# Altium PCB PCB1.PcbDoc (part 1 of 2)
Units mil, origin at the board's own origin, x right, y up, seen from the top; angles counter-clockwise.
Board outline 6255 x 1985 mil, 4 copper layers (Top Layer, Mid Layer 1, Mid Layer 2, Bottom Layer), stack 61.811 mil thick; 94 components, 195 nets, 609 pads, 417 vias.
Unrouted connection lines stored in the file: 4.
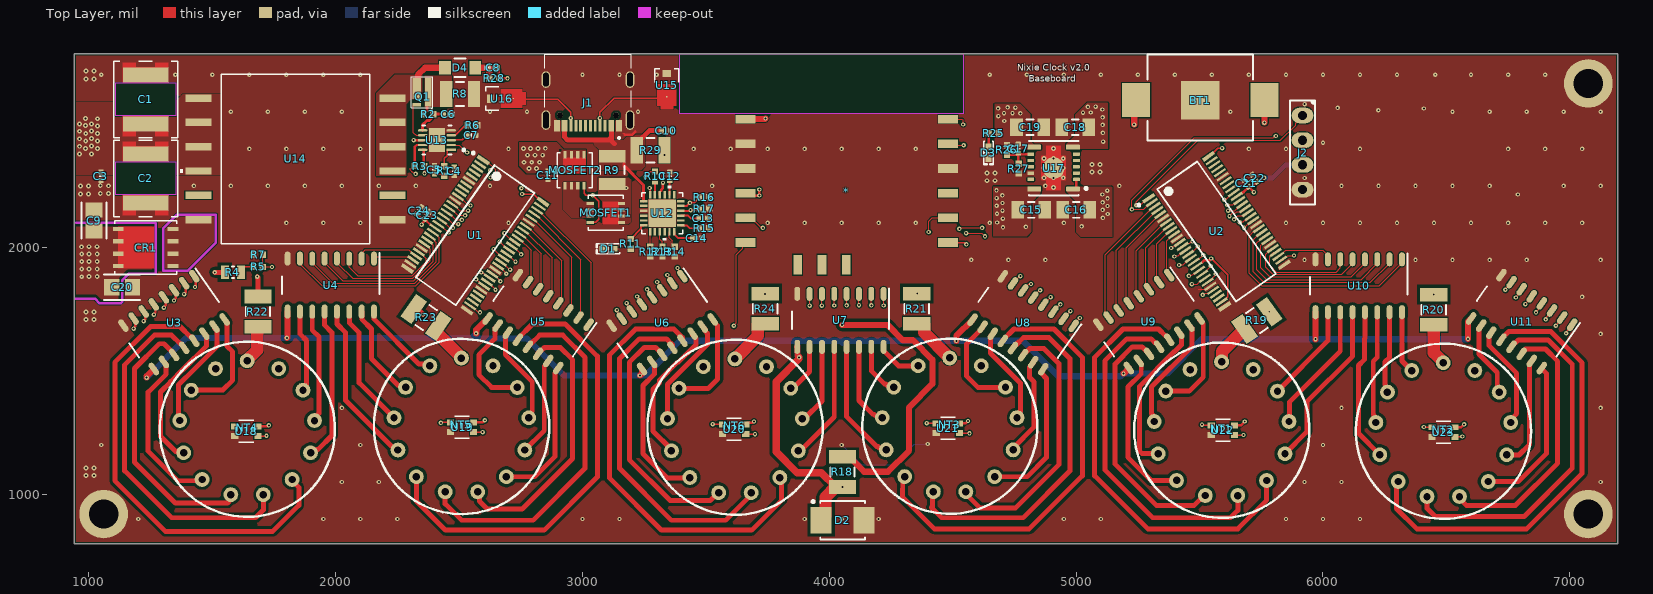
[diagram p0: Top Layer view]
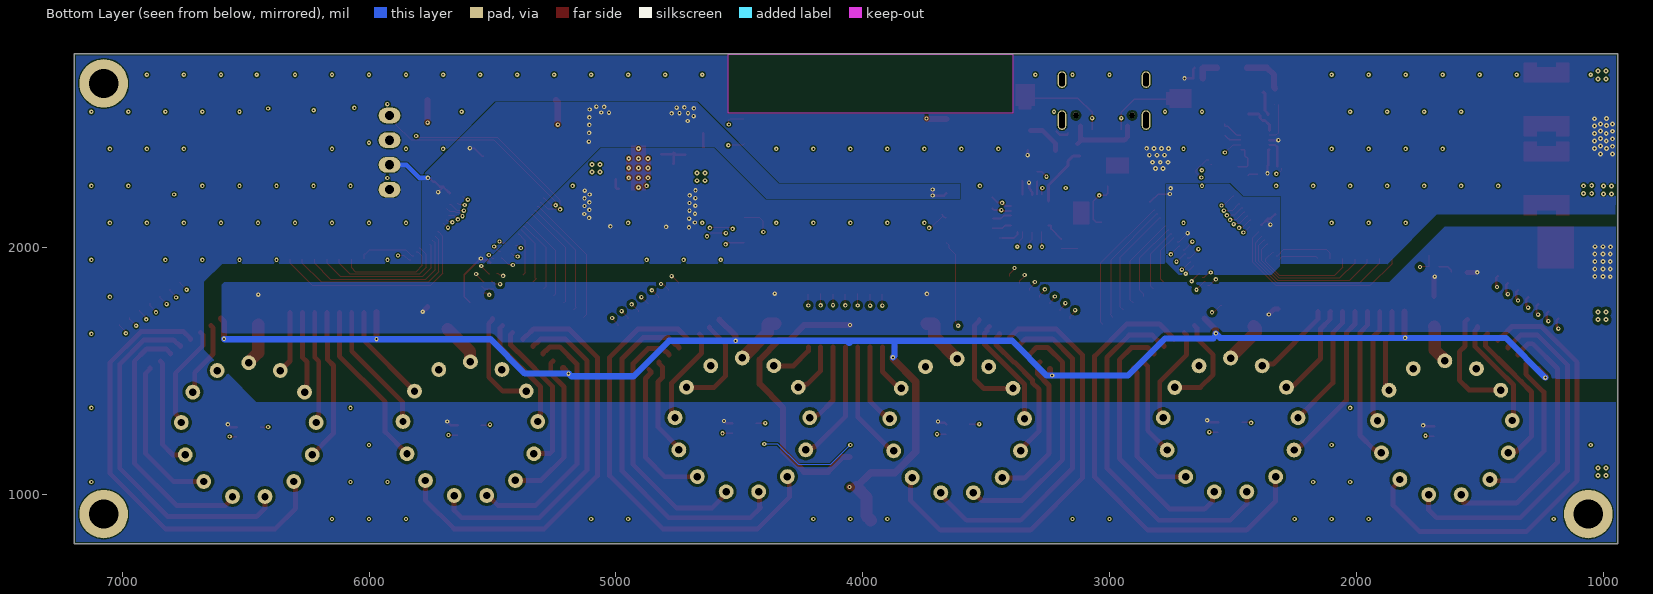
[diagram p1: Bottom Layer view, seen from below]
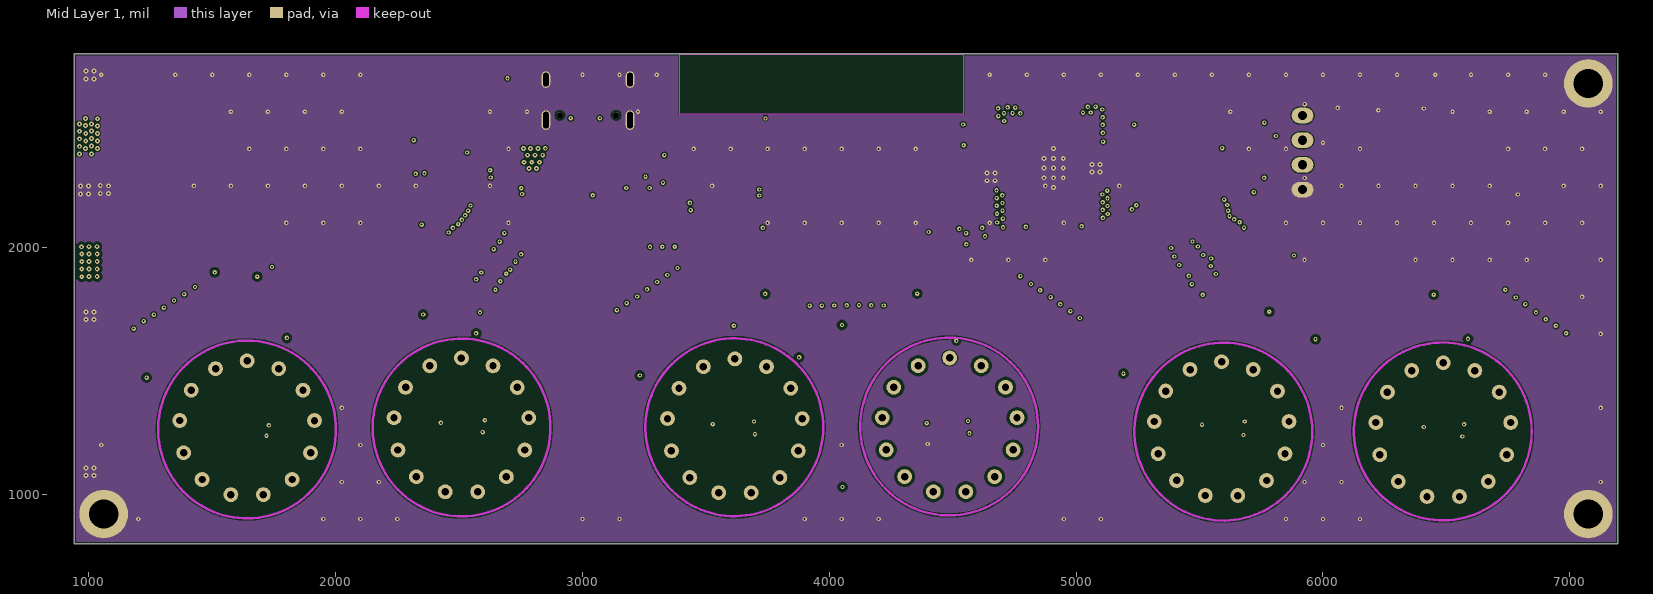
[diagram p2: Mid Layer 1]
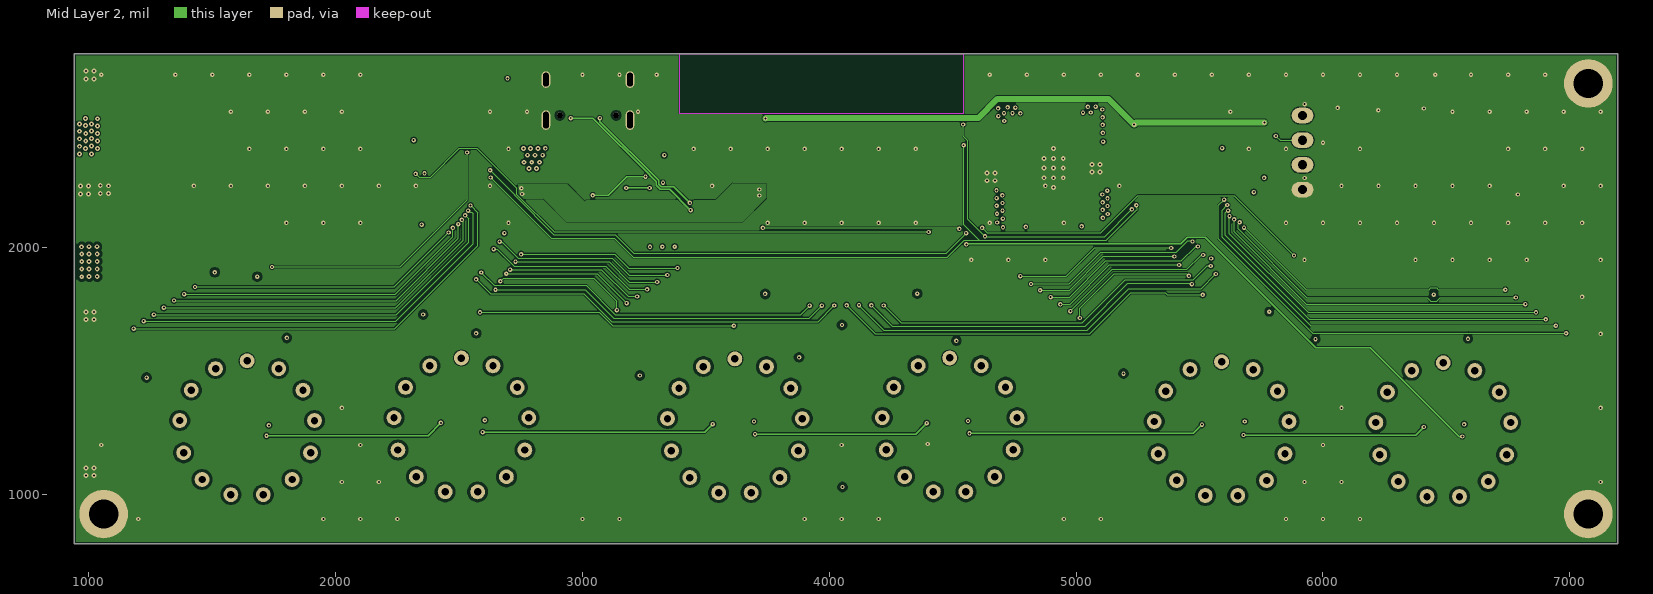
[diagram p3: Mid Layer 2]
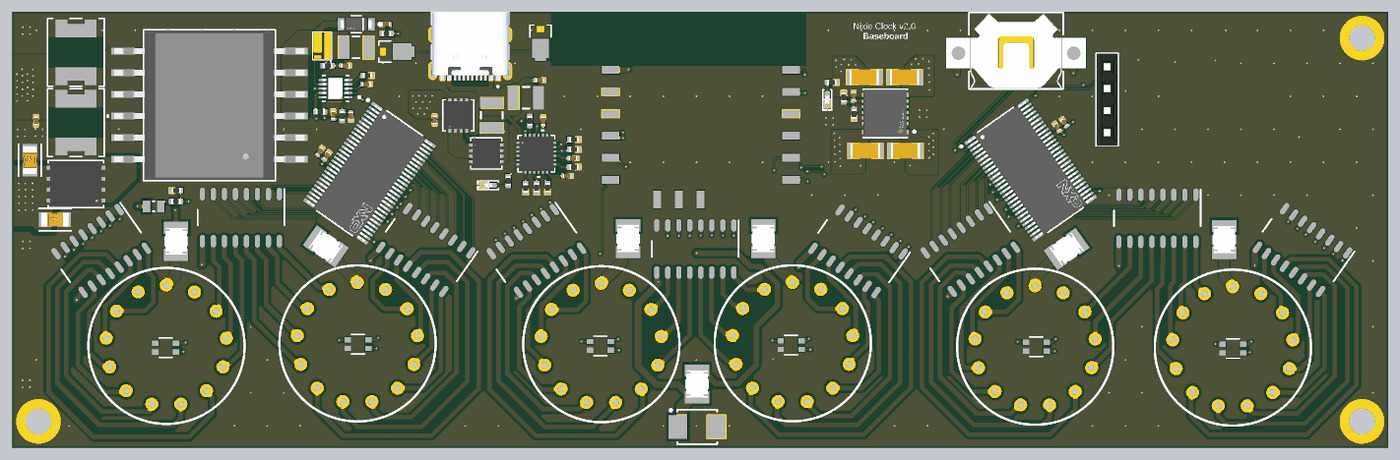
[diagram p5: 3D render of the assembled board from above, using the file's embedded part models]

## Layer stack, top to bottom
Top Solder: solder mask 0.5, Solder Resist, Dk 3.8
Top Layer: signal copper 1.378
Dielectric 1: prepreg 7.874, 7628, Dk 4.6
Mid Layer 1: signal copper 0.689
Core: core 41.9291, FR-4, Dk 4.5
Mid Layer 2: signal copper 0.689
Dielectric 2: prepreg 7.874, 7628, Dk 4.6
Bottom Layer: signal copper 1.378
Bottom Solder: solder mask 0.5, Solder Resist, Dk 3.8

## Board outline
940,800 7195,800 7195,2785 940,2785

## Design rules (kind name [scope] priority, off if disabled: settings)
BoardOutlineClearance [All] p1: gap=7.87 ignorepadtopadclearanceinfootprint=FALSE
Clearance "InNetClass('HV') and InPolygon" [InNetClass('HV')] p1: gap=11.81 ignorepadtopadclearanceinfootprint=FALSE
Clearance "InNetClass('HV') and InPolygon_1" [All vs InNetClass('HV')] p2: gap=11.81 ignorepadtopadclearanceinfootprint=FALSE
Clearance [All] p3: gap=4 ignorepadtopadclearanceinfootprint=FALSE except(5: Arc-Via Track-Via SMDPad-Via THPad-Via Via-Via Via-Fill Via-Poly Via-Region Via-Text; 9.84: Arc-Hole Track-Hole SMDPad-Hole THPad-Hole Via-Hole Fill-Hole Poly-Hole Region-Hole Text-Hole)
ComponentClearance [All] p1: gap=4 collisioncheckmode=3 verticalgap=4 showdistances=TRUE
DiffPairsRouting [All] p1: maxlimit=4 minlimit=4 mostfreqgap=4 toplayer_minwidth=4 toplayer_maxwidth=71497.94 toplayer_prefwidth=4 midlayer1_minwidth=4 midlayer1_maxwidth=71497.94 midlayer1_prefwidth=4 midlayer2_minwidth=4 midlayer2_maxwidth=71497.94 midlayer2_prefwidth=4 bottomlayer_minwidth=4 bottomlayer_maxwidth=71497.94 bottomlayer_prefwidth=4 maxuncoupledlength=500
Height [All] p1: minheight=0 maxheight=71497.94 prefheight=500
HoleSize [All] p1: absolutevalues=TRUE maxlimit=248.03 minlimit=7.87 maxpercent=80.000 minpercent=20.000
HoleToHoleClearance [All] p1: gap=9.84 allowstackedmicrovias=FALSE
MinimumAnnularRing [All] p1: minimumring=3
MinimumSolderMaskSliver [All] p1: minsoldermaskwidth=0
PlaneClearance PlaneClearance_HV [InNetClass('HV') and InPolygon  or  InPolygonClass('GND') and InNetClass('HV')] p1: clearance=19.68
PlaneClearance [All] p2: clearance=4
PlaneConnect PlaneConnectPowerPads [InPadClass('PowerPads')] p1: planeconnectstyle=Direct reliefexpansion=20 reliefentries=4 reliefconductorwidth=10 reliefairgap=10
PlaneConnect [All] p2: planeconnectstyle=Direct reliefexpansion=11.81 reliefentries=4 reliefconductorwidth=4 reliefairgap=4
PolygonConnect PolygonConnectPowerPads [All vs (InPadClass('PowerPads'))] p1: connectstyle=Direct reliefconductorwidth=10 reliefentries=4 polygonreliefangle="90 Angle" airgapwidth=10
PolygonConnect [All] p2: connectstyle=Direct reliefconductorwidth=4 reliefentries=4 polygonreliefangle="90 Angle" airgapwidth=4
RoutingVias [All] p1: holewidth=7.87 width=17.72 viastyle="Through Hole" minholewidth=7.87 minwidth=17.72 maxholewidth=248.03 maxwidth=257.87
SilkToSilkClearance [All] p1: silktosilkclearance=0
SilkToSolderMaskClearance [IsPad] p1: minsilkscreentomaskgap=4 clearancetoexposedcopper=TRUE
SolderMaskExpansion SolderMaskExpansion_Via [IsVia] p1: expansion=2.95 istentingtop=TRUE
SolderMaskExpansion [All] p2: expansion=2.95 istentingtop=FALSE
Width [All] p1: maxlimit=71497.94 minlimit=4 preferedwidth=4
20 further rules are at their usual default settings.

## Classes and differential pairs
net class HV: 170V COM DP_0_0 DP_0_1 DP_0_2 DP_0_3 DP_0_4 DP_0_5 DP_0_6 DP_0_7 DP_0_8 DP_0_9 DP_0_L DP_0_R DP_1_0 DP_1_1 DP_1_2 DP_1_3 DP_1_4 DP_1_5 DP_1_6 DP_1_7 DP_1_8 DP_1_9 DP_1_L DP_1_R DP_2_0 DP_2_1 DP_2_2 DP_2_3 DP_2_4 DP_2_5 DP_2_6 DP_2_7 DP_2_8 DP_2_9 DP_2_L DP_2_R DP_3_0 DP_3_1 DP_3_2 DP_3_3 DP_3_4 DP_3_5 DP_3_6 DP_3_7 DP_3_8 DP_3_9 DP_3_L DP_3_R DP_4_0 DP_4_1 DP_4_2 DP_4_3 DP_4_4 DP_4_5 DP_4_6 DP_4_7 DP_4_8 DP_4_9 DP_4_L DP_4_R DP_5_0 DP_5_1 DP_5_2 DP_5_3 DP_5_4 DP_5_5 DP_5_6 DP_5_7 DP_5_8 DP_5_9 DP_5_L DP_5_R
component class "HV Power": C1 C2 C3 C4 C5 C6 C7 C8 C9 C20 CR1 D4 Q1 R1 R2 R3 R4 R5 R6 R7 R8 R28 U13 U14
component class "ARGB LEDs": U18 U19 U20 U21 U22 U23
component class "Digital Supply": C15 C16 C17 C18 C19 D3 R25 R26 R27 U17
component class "USB PD": C10 C11 C12 C13 C14 D1 J1 MOSFET1 MOSFET2 R9 R10 R11 R12 R13 R14 R15 R16 R17 R29 U12 U15 U16
component class Drivers: C21 C22 C23 C24 D2 NT1 NT2 NT3 NT4 NT5 NT6 R18 R19 R20 R21 R22 R23 R24 U1 U2 U3 U4 U5 U6 U7 U8 U9 U10 U11

## Components (designator, comment, footprint, x,y, rotation, side; value= is the part's Value field where it differs from the comment)
* "" PCBComponent_1#1 3700.59,2787.4 r0 top
BT1 "" FP-3030-MFG 5502.95,2608.27 r180 top
C1 "T52M1107M035C0055" CAP_35C0055_VIS 1230,2600 r270 top
C2 "T52M1107M035C0055" CAP_35C0055_VIS 1230,2280 r90 top
C3 "Capacitor 10µF +/-40% 6.3V 0402" CAPC0402(1005)60_L 1048.94,2288.18 r90 top value=10u
C4 "Capacitor 10µF +/-40% 6.3V 0402" CAPC0402(1005)60_L 2480.32,2309.06 r270 top value=100p
C5 "Capacitor 10µF +/-40% 6.3V 0402" CAPC0402(1005)60_L 2400,2315 r90 top value=22n
C6 "Capacitor 10µF +/-40% 6.3V 0402" CAPC0402(1005)60_L 2455,2540 r180 top value=0.1u
C7 "Capacitor 10µF +/-40% 6.3V 0402" CAPC0402(1005)60_L 2550,2455 r180 top value=0.1u
C8 "Capacitor 10µF +/-40% 6.3V 0402" CAPC0402(1005)60_L 2637.8,2728.35 r0 top value=100p
C9 "C3216X7T2E224K160AA" FP-C3216-160-0_2-IPC_C 1020.67,2109.25 r90 top
C10 "Capacitor 10µF +/-40% 6.3V 0402" CAPC0402(1005)60_L 3338.58,2473.43 r0 top value=0.1u
C11 "Capacitor 10µF +/-40% 6.3V 0402" CAPC0402(1005)60_L 2860,2292.28 r270 top value=0.1u
C12 "Capacitor 10µF +/-40% 6.3V 0402" CAPC0402(1005)60_L 3353.76,2288.03 r90 top value=0.1u
C13 "Capacitor 10µF +/-40% 6.3V 0402" CAPC0402(1005)60_L 3488.76,2118.03 r0 top value=0.1u
C14 "Capacitor 10µF +/-40% 6.3V 0402" CAPC0402(1005)60_L 3463.76,2038.03 r0 top value=0.1u
C15 "Capacitor 10 uF +/- 10% 16 V 1206" CAPC3216X180X50NL20T25 4818.11,2152.12 r180 top value=10u
C16 "Capacitor 10 uF +/- 10% 16 V 1206" CAPC3216X180X50NL20T25 5000.19,2152.12 r0 top value=10u
C17 "Capacitor 22pF +/-10% 50V 0402" CAPC0402(1005)60_L 4764.96,2401.13 r90 top value=22p
C18 "Capacitor 10 uF +/- 10% 16 V 1206" CAPC3216X180X50NL20T25 4996.26,2486.76 r0 top value=47u
C19 "Capacitor 10 uF +/- 10% 16 V 1206" CAPC3216X180X50NL20T25 4813.19,2486.76 r180 top value=47u
C20 "C3216X7T2E224K160AA" FP-C3216-160-0_2-IPC_C 1134.95,1839.09 r0 top
C21 "Capacitor 10µF +/-40% 6.3V 0402" CAPC0402(1005)60_L 5688.98,2259.84 r125 top value=0.1u
C22 "Capacitor 10µF +/-40% 6.3V 0402" CAPC0402(1005)60_L 5722.76,2280.76 r125 top value=0.1u
C23 "Capacitor 10µF +/-40% 6.3V 0402" CAPC0402(1005)60_L 2370.08,2129.92 r55 top value=0.1u
C24 "Capacitor 10µF +/-40% 6.3V 0402" CAPC0402(1005)60_L 2338.58,2149.61 r55 top value=0.1u
CR1 "STTH5R06DJF-TR" POWERFLAT5X6_STM 1230,2000 r180 top
D1 "Red" "LED 0402_1005 YELLOW" 3105,1995 r180 top
D2 "SZ1SMB5948BT3G" ONSC-SMB-2-403A-03_H_V 4053.7,895.05 r0 top
D3 "Yellow" "LED 0402_1005 YELLOW" 4644.69,2384.84 r270 top
D4 "NRVUS1GFA" FP-425AB-MFG 2503.94,2728.35 r180 top
J1 "TYPE-C-31-M-12" HRO_TYPE-C-31-M-12 3022.05,2680.32 r180 top
J2 "" "SAMTEC SSW-104-03-T-S" 5917.32,2384.84 r270 top
MOSFET1 "DMN3008SFGQ-7" PowerDI3333-8_DIO 3095,2140 r0 top
MOSFET2 "DMN3008SFGQ-7" PowerDI3333-8_DIO 2967.8,2313 r90 top
NT1 "Component_1" PCBComponent_1#2 5590,1260 r180 top
NT2 "Component_1" PCBComponent_1#2 6488.19,1255.91 r180 top
NT3 "Component_1" PCBComponent_1#2 4488.19,1275.59 r180 top
NT4 "Component_1" PCBComponent_1#2 1641.73,1263.78 r180 top
NT5 "Component_1" PCBComponent_1#2 2510,1275 r180 top
NT6 "Component_1" PCBComponent_1#2 3618.11,1271.65 r180 top
Q1 "GAN E-Mode NFET" PCBComponent_1#3 2388.93,2585.98 r180 top
R1 "Resistor 10k +/-1% 0402 63 mW" RESC1005X40X25ML05T05 2440,2310 r270 top value=10k
R2 "Resistor 10k +/-1% 0402 63 mW" RESC1005X40X25ML05T05 2375,2540 r0 top value=22R
R3 "Resistor 10k +/-1% 0402 63 mW" RESC1005X40X25ML05T05 2340,2330 r0 top value=12k
R4 "CRCW08050000Z0EA" RESC2013X50X30LL20T20 1583.66,1899.61 r180 top
R5 "Resistor 10k +/-1% 0402 63 mW" RESC1005X40X25ML05T05 1685.28,1921.17 r180 top value=63.4k
R6 "Resistor 10k +/-1% 0402 63 mW" RESC1005X40X25ML05T05 2555,2495 r0 top value=240k
R7 "Resistor 10k +/-1% 0402 63 mW" RESC1005X40X25ML05T05 1685.6,1971.17 r180 top value=10k
R8 "0.02R 1W" RESC3225X70X50NL20T20 2503.94,2622.05 r180 top
R9 "0.02R 1W" RESC3225X70X50NL20T20 3120,2313.9 r90 top
R10 "Resistor 10k +/-1% 0402 63 mW" RESC1005X40X25ML05T05 3293.76,2288.03 r270 top value=100R
R11 "Resistor 10k +/-1% 0402 63 mW" RESC1005X40X25ML05T05 3195,2014.68 r90 top value=1.5k
R12 "Resistor 10k +/-1% 0402 63 mW" RESC1005X40X25ML05T05 3273.76,1983.03 r90 top value=100k
R13 "Resistor 10k +/-1% 0402 63 mW" RESC1005X40X25ML05T05 3323.76,1983.35 r90 top value=100k
R14 "Resistor 10k +/-1% 0402 63 mW" RESC1005X40X25ML05T05 3373.76,1983.35 r90 top value=100k
R15 "Resistor 10k +/-1% 0402 63 mW" RESC1005X40X25ML05T05 3493.45,2078.03 r180 top value=16k
R16 "Resistor 10k +/-1% 0402 63 mW" RESC1005X40X25ML05T05 3493.76,2203.03 r0 top value=5.1k
R17 "Resistor 10k +/-1% 0402 63 mW" RESC1005X40X25ML05T05 3493.76,2158.03 r0 top value=5.1k
R18 "CRCW121033K0JNEA" FP-CRCW1210-e3-IPC_A 4053.15,1090.55 r90 top
R19 "CRCW121033K0JNEA" FP-CRCW1210-e3-IPC_A 5732.28,1704.72 r35 top
R20 "CRCW121033K0JNEA" FP-CRCW1210-e3-IPC_A 6448.82,1748.03 r90 top
R21 "CRCW121033K0JNEA" FP-CRCW1210-e3-IPC_A 4354.33,1751.97 r90 top
R22 "CRCW121033K0JNEA" FP-CRCW1210-e3-IPC_A 1685.04,1740.16 r90 top
R23 "CRCW121033K0JNEA" FP-CRCW1210-e3-IPC_A 2366.14,1716.54 r145 top
R24 "CRCW121033K0JNEA" FP-CRCW1210-e3-IPC_A 3740.16,1751.97 r90 top
R25 "Resistor 10k +/-1% 0402 63 mW" RESC1005X40X25ML05T05 4665.55,2463.14 r0 top value=1.5k
R26 "Resistor 10k +/-1% 0402 63 mW" RESC1005X40X25ML05T05 4719.68,2395.23 r90 top value=10k
R27 "Resistor 10k +/-1% 0402 63 mW" RESC1005X40X25ML05T05 4766.93,2319.44 r270 top value=4.32k
R28 "Resistor 10k +/-1% 0402 63 mW" RESC1005X40X25ML05T05 2641.73,2685.04 r0 top value=10k
R29 "IsDirectPower DNC" RESC3225X70X50NL20T20 3275.59,2393.7 r180 top
U1 "PCA9698DGG,512" FP-SOT364-1-MFG 2565,2050 r325 top
U2 "PCA9698DGG,512" FP-SOT364-1-MFG 5568.9,2064.96 r35 top
U3 "SN75469DR" D0016A_N 1344.9,1695.9 r305 top
U4 "SN75469DR" D0016A_N 1980,1847.72 r270 top
U5 "SN75469DR" D0016A_N 2820,1700 r235 top
U6 "SN75469DR" D0016A_N 3322.83,1695.87 r305 top
U7 "SN75469DR" D0016A_N 4045,1705 r270 top
U8 "SN75469DR" D0016A_N 4785,1695 r235 top
U9 "SN75469DR" D0016A_N 5295,1700 r305 top
U10 "SN75469DR" D0016A_N 6145,1845 r270 top
U11 "SN75469DR" D0016A_N 6805,1700 r235 top
U12 "AP33771DKZ-13" QFN24_W-QFN4040-24_A1_DIO 3322.85,2138.98 r0 top
U13 "LT3757EDD#PBF" FP-DD-10-05-08-1699-IPC_A 2410,2435 r180 top
U14 "DA2032-ALD" SOIC12_LT3750_DA2032_14P98X17P2_COC 1837,2359.21 r180 top
U15 "T6N12CAHM3I" DFN3820A-2_VIS 3341.54,2638.98 r90 top
U16 "T6N12CAHM3I" DFN3820A-2_VIS 2691.93,2603.35 r180 top
U17 "TPSM53604RDAR" FP-RDA0015A-MFG 4908.46,2321.85 r180 top
U18 "WS2812B-2020" SMT_12B-2020_WDS 1637.8,1255.91 r0 top
U19 "WS2812B-2020" SMT_12B-2020_WDS 2511.81,1271.65 r0 top
U20 "WS2812B-2020" SMT_12B-2020_WDS 3614.17,1263.78 r0 top
U21 "WS2812B-2020" SMT_12B-2020_WDS 4480.31,1267.72 r0 top
U22 "WS2812B-2020" SMT_12B-2020_WDS 5594.49,1259.84 r0 top
U23 "WS2812B-2020" SMT_12B-2020_WDS 6488.19,1251.97 r0 top

## Footprints (in the part's own frame and the unit in brackets; to place one, negate y for a bottom-side part, rotate by r counter-clockwise, add the part's x,y. Pads: shape width x height; smd on the part's side, far side on the other; paste and mask are expansions set on the pad)
CAP_35C0055_VIS [mil]
  rect 60.5x185 smd paste+0 mask+0: 1(-99.25,0) 2(99.25,0)
  Top Layer region: 149.5,-92.5 69,-92.5 69,92.5 149.5,92.5 149.5,39.35 129.5,39.35 129.5,-39.35 149.5,-39.35
  Top Layer region: -69,92.5 -69,-92.5 -149.5,-92.5 -149.5,-39.35 -129.5,-39.35 -129.5,39.35 -149.5,39.35 -149.5,92.5
  Top Layer keep-out region: -67,-122 -67,122 67,122 67,-122
  silkscreen extent -155,-129 155,129
CAPC0402(1005)60_L [mm] "Chip Capacitor, Body 1.0x0.5mm, Height 0.6mm, IPC High Density"
  rrect25% 0.5x0.55 smd: 1(-0.45,0) 2(0.45,0)
  silkscreen extent 0,-0.2 0,0.2, body extent -0.5,-0.25 0.5,0.25, height 0.6
CAPC3216X180X50NL20T25 [mm] "Chip Capacitor, 2-Leads, Body 3.40x1.80mm, IPC Medium Density"
  rect 1.3x1.8 smd: 1(-1.4,0) 2(1.4,0)
  silkscreen extent -0.35,-0.8 0.35,0.8, body extent -1.7,-0.9 1.7,0.9, height 1.8
D0016A_N [mm]
  oval 1.45x0.6 smd paste+0 mask+0: 1(-2.725,4.445) 2(-2.725,3.175) 3(-2.725,1.905) 4(-2.725,0.635) 5(-2.725,-0.635) 6(-2.725,-1.905) 7(-2.725,-3.175) 8(-2.725,-4.445) 9(2.725,-4.445) 10(2.725,-3.175) 11(2.725,-1.905) 12(2.725,-0.635) 13(2.725,0.635) 14(2.725,1.905) 15(2.725,3.175) 16(2.725,4.445)
  silkscreen extent -3.3,-5 0.9,5
DFN3820A-2_VIS [mil]
  rect 5x5 smd paste-2.5 mask-2.5: 1(-27.76,0)
  rect 28x34 smd paste-14 mask+0: 2(65.98,0)
  Top Layer region: 2,-36.02 2,-36.02 2,-36.02 2,-36.02 2,-36.02 2,-36.02 2,-36.02 2,-36.02
  Top Layer region: 2,36.02 2,36.02 2,36.02 2,36.02 2,36.02 2,36.02 2,36.02 2,36.02
  Top Layer region: -77.96,25.59 -77.96,-25.59 -64.18,-25.59 -64.18,-37.99 22.43,-37.99 22.43,37.99 -64.18,37.99 -64.18,25.59
  silkscreen extent 31,-48 85,48
FP-425AB-MFG [mm]
  rect 1.2x1.4 smd paste+0 mask+0: 1(-1.55,0) 2(1.55,0)
  silkscreen extent -2.83,-0.95 0.58,0.95, body extent -2.25,-1.05 2.25,1.05, height 0.25
FP-3030-MFG [mm]
  rect 3.96x3.96 smd paste-1000 mask+0: 1(0,0.292)
  rect 2.9x3.5 smd paste+0 mask+0: 2(-6.6,0.292) 2(6.6,0.292)
  silkscreen extent -5.44,-4.43 5.44,4.43, body extent -8.15,-4.53 8.15,4.53, height 0.25
FP-C3216-160-0_2-IPC_C [mil]
  rect 61.18x67.17 smd paste+0 mask+0: 1(-42.37,0) 2(42.37,0)
  silkscreen extent -73,-51 73,51, body extent -77,-39 77,39, height 10
FP-CRCW1210-e3-IPC_A [mil]
  rect 55.31x110.48 smd paste+0 mask+0: 1(-61.05,0) 2(61.05,0)
  silkscreen extent -19,-49 19,49, body extent -108,-75 108,75, height 10
FP-DD-10-05-08-1699-IPC_A [mm]
  rect 0.981x0.242 smd paste+0 mask+0: 1(-1.466,1)
  rrect100% 0.981x0.242 smd paste+0 mask+0: 2(-1.466,0.5) 3(-1.466,0) 4(-1.466,-0.5) 5(-1.466,-1) 6(1.466,-1) 7(1.466,-0.5) 8(1.466,0) 9(1.466,0.5) 10(1.466,1)
  rect 1.65x2.48 smd paste-1000 mask+0: 11(0,0)
  silkscreen extent -2.88,-1.5 1.5,1.5, body extent -2.46,-2 2.46,2, height 0.25
FP-RDA0015A-MFG [mm]
  rrect20% 1.4x0.5 smd paste-1000 mask+0: 1(-2,2.145) 7(-2,-2.155) 8(2,-2.155) 14(2,2.145)
  rrect29% 0.7x0.35 smd paste-1000 mask+0: 2(-2.35,1.17) 3(-2.35,0.52) 4(-2.35,-0.13) 5(-2.35,-0.78) 6(-2.35,-1.43) 9(2.35,-1.43) 10(2.35,-0.78) 11(2.35,-0.13) 12(2.35,0.52) 13(2.35,1.17)
  round 2.25 smd paste-1000 mask+0: 15(0,0)
  Top Layer region: -0.75,2.3 -0.757,2.275 -0.75,2.25 -0.75,2.25 -0.75,1.3 -0.754,1.281 -0.765,1.265 -0.781,1.254 -0.8,1.25 -0.8,1.25 -1.2,1.25 -1.225,1.243 -1.243,1.225 -1.25,1.2 -1.25,1.2 -1.25,-1.2 -1.243,-1.225 -1.225,-1.243 -1.2,-1.25 -1.2,-1.25 -0.8,-1.25 -0.781,-1.254 -0.765,-1.265 -0.754,-1.281 -0.75,-1.3 -0.75,-1.3 -0.75,-2.25 -0.743,-2.275 -0.725,-2.293 -0.7,-2.3 -0.7,-2.3 0.7,-2.3 0.725,-2.293 0.743,-2.275 0.75,-2.25 0.75,-2.25 0.75,-1.3 0.754,-1.281 0.765,-1.265 0.781,-1.254 0.8,-1.25 0.8,-1.25 1.2,-1.25 1.225,-1.243 1.243,-1.225 1.25,-1.2 1.25,-1.2 1.25,1.2 1.243,1.225 1.225,1.243 1.2,1.25 1.2,1.25 0.8,1.25 0.781,1.254 0.765,1.265 0.754,1.281 0.75,1.3 0.75,1.3 0.75,2.25 0.743,2.275 0.725,2.293 0.7,2.3 0.7,2.3
  silkscreen extent -3.48,-2.8 2.55,2.8, body extent -2.8,-2.9 2.8,2.9, height 0.25
FP-SOT364-1-MFG [mm]
  rect 1.4x0.4 smd paste+0 mask+0: 1(-3.75,6.81) 28(-3.75,-6.81) 29(3.75,-6.81) 56(3.75,6.81)
  rect 1.4x0.28 smd paste+0 mask+0: 2(-3.75,6.25) 3(-3.75,5.75) 4(-3.75,5.25) 5(-3.75,4.75) 6(-3.75,4.25) 7(-3.75,3.75) 8(-3.75,3.25) 9(-3.75,2.75) 10(-3.75,2.25) 11(-3.75,1.75) 12(-3.75,1.25) 13(-3.75,0.75) 14(-3.75,0.25) 15(-3.75,-0.25) 16(-3.75,-0.75) 17(-3.75,-1.25) 18(-3.75,-1.75) 19(-3.75,-2.25) 20(-3.75,-2.75) 21(-3.75,-3.25) 22(-3.75,-3.75) 23(-3.75,-4.25) 24(-3.75,-4.75) 25(-3.75,-5.25) 26(-3.75,-5.75) 27(-3.75,-6.25) 30(3.75,-6.25) 31(3.75,-5.75) 32(3.75,-5.25) 33(3.75,-4.75) 34(3.75,-4.25) 35(3.75,-3.75) 36(3.75,-3.25) 37(3.75,-2.75) 38(3.75,-2.25) 39(3.75,-1.75) 40(3.75,-1.25) 41(3.75,-0.75) 42(3.75,-0.25) 43(3.75,0.25) 44(3.75,0.75) 45(3.75,1.25) 46(3.75,1.75) 47(3.75,2.25) 48(3.75,2.75) 49(3.75,3.25) 50(3.75,3.75) 51(3.75,4.25) 52(3.75,4.75) 53(3.75,5.25) 54(3.75,5.75) 55(3.75,6.25)
  silkscreen extent -5.12,-7.05 2.5,7.05, body extent -4.55,-7.3 4.55,7.3, height 0.25
HRO_TYPE-C-31-M-12 [mm]
  rect 0.6x1.14 smd mask+0.05: A1_B12(-3.2,4.75) A4_B9(-2.4,4.75) B1_A12(3.2,4.75) B4_A9(2.4,4.75)
  rect 0.3x1.14 smd mask+0.05: A5(-1.25,4.75) A6(-0.25,4.75) A7(0.25,4.75) A8(1.25,4.75) B5(1.75,4.75) B6(0.75,4.75) B7(-0.75,4.75) B8(-1.75,4.75)
  oval 0.9x2 hole 0.6 slot 1.7 at 90 deg: S1(-4.325,4.17) S2(4.325,4.17)
  oval 0.9x1.7 hole 0.6 slot 1.4 at 90 deg: S3(-4.325,0) S4(4.325,0)
  round 0.6 hole 0.6 unplated: ""(-2.89,3.68) ""(2.89,3.68)
  silkscreen extent -4.47,-2.6 4.47,6.1, body extent -4.47,-2.6 4.47,5.31, height 3.31
"LED 0402_1005 YELLOW" [mm] "Chip Diode, 2-Leads, Body 1.00x0.50mm, IPC Medium Density"
  rect 0.75x0.6 smd: 1(-0.575,0) 2(0.575,0)
  silkscreen extent -1.14,-0.51 1.27,0.51, body extent -0.5,-0.25 0.5,0.25, height 0.21
ONSC-SMB-2-403A-03_H_V [mil] "Molded, 2-Leads, Body 4.6x3.95mm"
  rect 85x107.99 smd: 1(-87.01,0) 2(87.01,0)
  silkscreen extent -125,-79 91,81, body extent -91,-78 91,78, height 95
PCBComponent_1#1 [mil]
  rect 80x35 smd: 1(-40.28,-267.13) 2(-40.28,-367.13) 3(-40.28,-467.13) 4(-40.28,-567.13) 5(-40.28,-667.13) 6(-40.28,-767.13) 10(779.72,-767.13) 11(779.72,-667.13) 12(779.72,-567.13) 13(779.72,-467.13) 14(779.72,-367.13) 15(779.72,-267.13)
  rect 35x80 smd: 7(171.02,-857.13) 8(269.45,-857.13) 9(367.87,-857.13)
  Top Layer lines w6: -40.28,-667.13 -34.78,-667.13 -27.53,-659.88 -20.28,-652.63
PCBComponent_1#2 [mil]
  round 60 hole 30: 1(0.74,-277.03) 2(-127.18,-245.47) 3(-225.65,-158.15) 4(-272.27,-35.07) 5(-256.36,95.58) 6(-181.56,203.87) 7(-65,265) 8(66.61,264.97) 9(183.14,203.78) 10(257.88,95.45) 11(273.73,-35.21) 12(227.04,-158.26) 13(128.53,-245.53)
  silkscreen extent -355,-355 355,355
PCBComponent_1#3 [mil]
  rect 33.46x13.78 / inner rect 0x0 / far side rect 0x0 all layers, no hole: 1(60.16,7)
  rect 25.2x115.75 / inner rect 0x0 / far side rect 0x115.75 all layers, no hole: 2(13.93,-44.02)
  rect 33.46x86.22 / inner rect 0x0 / far side rect 0x0 all layers, no hole: 3(60.11,-58.67)
  silkscreen extent -4,-106 83,30
PowerDI3333-8_DIO [mil]
  rect 30x13 smd paste+0 mask+0: 1(-63,38.39) 2(-63,12.8) 3(-63,-12.8) 4(-63,-38.39) 5(63,-38.39) 6(63,-12.8) 7(63,12.8) 8(63,38.39)
  Top Layer region: 51,-45.5 51,45.5 -13,45.5 -13,-45.5
  silkscreen extent -71,-71 71,71, body extent -66,-66 66,66, height 32
POWERFLAT5X6_STM [mil]
  rect 44x18 smd paste+0 mask+0: 1(-111,75) 2(-111,25) 3(-111,-25) 4(-111,-75) 5(111,-75) 6(111,-25) 7(111,25) 8(111,75)
  Top Layer region: 112,-85 112,85 -34,85 -34,-85
  silkscreen extent -126,-108 126,108, body extent -121,-103 121,103, height 39
QFN24_W-QFN4040-24_A1_DIO [mil]
  rect 30x10 smd paste+0 mask+0: 1(-75.5,49.21) 2(-75.5,29.53) 3(-75.5,9.84) 4(-75.5,-9.84) 5(-75.5,-29.53) 6(-75.5,-49.21) 13(75.5,-49.21) 14(75.5,-29.53) 15(75.5,-9.84) 16(75.5,9.84) 17(75.5,29.53) 18(75.5,49.21)
  rect 10x30 smd paste+0 mask+0: 7(-49.21,-75.5) 8(-29.53,-75.5) 9(-9.84,-75.5) 10(9.84,-75.5) 11(29.53,-75.5) 12(49.21,-75.5) 19(49.21,75.5) 20(29.53,75.5) 21(9.84,75.5) 22(-9.84,75.5) 23(-29.53,75.5) 24(-49.21,75.5)
  rect 112x112 smd paste+0 mask+0: 25(0,0)
  silkscreen extent -84,-110 84,110, body extent -79,-79 79,79, height 55
RESC1005X40X25ML05T05 [mm] "Chip Resistor, 2-Leads, Body 1.05x0.55mm, IPC Low Density"
  rect 0.65x0.65 smd: 1(-0.5,0) 2(0.5,0)
  body extent -0.53,-0.28 0.53,0.28, height 0.4
RESC2013X50X30LL20T20 [mm] "Chip Resistor, 2-Leads, Body 2.00x1.25mm, IPC High Density"
  rect 0.85x1.35 smd: 1(-0.825,0) 2(0.825,0)
  silkscreen extent -0.1,-0.58 0.1,0.58, body extent -1.1,-0.72 1.1,0.72, height 0.5
RESC3225X70X50NL20T20 [mm] "Chip Resistor, 2-Leads, Body 3.20x2.50mm, IPC Medium Density"
  rect 1.25x2.7 smd: 1(-1.425,0) 2(1.425,0)
  silkscreen extent -0.4,-1.25 0.4,1.25, body extent -1.7,-1.35 1.7,1.35, height 0.7
"SAMTEC SSW-104-03-T-S" [mm]
  oval 1.6x2.25 hole 0.95: 1(-3.81,0) 2(-1.27,0) 3(1.27,0) 4(3.81,0)
  silkscreen extent -5.34,-1.27 5.34,1.27, body extent -5.33,-1.21 5.33,1.21, height 8.51
SMT_12B-2020_WDS [mil]
  rect 29x24 smd paste+0 mask+0: 1(-47,19.68) 2(-47,-19.69) 3(47,-19.69) 4(47,19.68)
  silkscreen extent -30,-44 30,44
SOIC12_LT3750_DA2032_14P98X17P2_COC [mil]
  rect 107x30 smd paste+0 mask+0: 1(-393,246.06) 2(-393,147.64) 3(-393,49.21) 4(-393,-49.21) 5(-393,-147.64) 6(-393,-246.06) 7(393,-246.06) 8(393,-147.64) 9(393,-49.21) 10(393,49.21) 11(393,147.64) 12(393,246.06)
  silkscreen extent -300,-344 466,343, body extent -433,-339 433,339, height 350

## Part data
* Q1: library part Component_1
BT1: library part CMP-19636-000028-1, "BATT RETAINER COIN 10MM 1CEL SMD", Case/Package=SMD/SMT, Package Quantity=100, Contact Plating=Tin, Lead Free="Lead Free", Material=Bronze, Mount="Surface Mount", Number of Cells=1, RoHS Compliant=Yes, series=-, Termination=SMD/SMT
C1 C2 U15 U16: "No Description Available", Mfr_Name=Vishay
  U15 U16: RefDes=RefDes, Type=Type
C3 C4 C5 C6 C7 C8 C10 C11 C12 C13 C14 C21 C22 C23 C24: library part CMP-001-00074-3, "Chip Capacitor, 0.1µF +/-40%, 6.3V, 0402, Thickness 0.6 mm", Case/Package=0402, Max Operating Temperature=85°C, Min Operating Temperature=-55°C, Tolerance=10%, Voltage Rating=6.3V, Mounting Technology=SMT, Pins=2
C9 C20: library part CMP-08246-005598-1, "Multilayer Ceramic Capacitors 220nF ±10% 250V X7T SMD 1206", Capacitance=220nF, Case Code (Imperial)=1206, Case Code (Metric)=3216, Dielectric=X7T, Max Operating Temperature=125°C, Min Operating Temperature=-55°C, Package Quantity=1, Tolerance=10%, Voltage Rating=250V, Case/Package=1206, Depth=1.6mm, Lead Free="Lead Free", Length=0.126inch, Mount="Surface Mount", packaging="Tape and Reel", REACH SVHC="No SVHC", RoHS Compliant=Yes, series=C, Thickness=0.075inch, Voltage Rating (DC)=250V, Width=0.063inch
C15 C16 C18 C19: library part CMP-001-00016-6, "Chip Capacitor, 47 uF, +/- 10%, 16 V, 1206 (3216 Metric)", Capacitor Type=Ceramic, Case/Package=1206, Max Operating Temperature=125°C, Min Operating Temperature=-55°C, Tolerance=10%, Voltage Rating=16V, Mounting Technology=SM, Pins=2, RoHS Compliant=True
C17: library part CMP-001-00073-3, "Chip Capacitor, 22pF +/-10%, 50V, 0402, Thickness 0.6 mm", Case/Package=0402, Max Operating Temperature=85°C, Min Operating Temperature=-55°C, Tolerance=10%, Voltage Rating=50V, Mounting Technology=SMT, Pins=2
CR1: "No Description Available", Mfr_Name=STMicroelectronics, RefDes=RefDes, Type=Type
D1: library part BL-HKC37A-AV-TRB, "0402 RED", Color=Yellow, Current - Test=20mA, Device Package="0402 (1005 Metric)", Lens Color=Colorless, Manufacturer="American Bright Optoelectronics Corporation", Millicandela Rating=120mcd, Supplier Device Package=0402, Supplier Part Number 1=BL-HKC37A-AV-TRBCT-ND, Voltage - Forward (Vf) (Typ)=2.2V, componentlink1description=Datasheet, componentlink1url=https://americanbrightled.com/pdffiles/smt/BL-HKC37A-AV-TRB.pdf, ComponentLink2Description="DigiKey Link", ComponentLink2URL=https://www.digikey.com/en/products/detail/american-bright-optoelectronics-corporation/BL-HKC37A-AV-TRB/9678171, Configuration=Standard, Height (Max)=0.45mm, lastupdated="11/9/2022 10:29:51 am", Lens Style="Rectangle with Flat Top", Lens Transparency=Clear, Lifecycle Status=Active, Minimum Order=1, Mounting Type="Surface Mount", Package / Case="0402 (1005 Metric)", packaging=TapeAndReel, Part Number=BL-HKC37A-AV-TRB, Part Status=Active, partid=1041, price=0.06, series=-, Size / Dimension="1.00mm L x 0.50mm W", Supplier 1=DigiKey, Viewing Angle=120°, Wavelength - Dominant=589nm, Wavelength - Peak=590nm
D2: library part CMP-1060-00202-1, "3 W Zener Voltage Regulator, 2-Pin SMB, Pb-Free, Tape and Reel", Manufacturer="On Semiconductor", componentlink1description="Manufacturer URL", componentlink1url=http://www.onsemi.com/, ComponentLink2Description=Datasheet, ComponentLink2URL=http://www.onsemi.cn/pub_link/Collateral/1SMB5913BT3-D.PDF, ComponentLink3Description="Package Specification", ComponentLink3URL=http://www.onsemi.com/pub_link/Collateral/1SMB5913BT3-D.PDF, DatasheetVersion="Rev. 8", Mounting Technology="Surface Mount", PackageDescription="2-Pin Small Molded Package, J-Bend Lead, Body 4.33 x 3.625 mm", PackageReference=SMB-2-403A-03_H, PackageVersion="Rev. H, 05/2011", Packing="Tape and Reel", PartNumber=SZ1SMB5948BT3G, RoHS=Pb-Free, VZ Typ (V)=91
D3: library part BL-HKC37A-AV-TRB, "0402 YELLOW", Current - Test=20mA, Device Package="0402 (1005 Metric)", Lens Color=Colorless, Manufacturer="American Bright Optoelectronics Corporation", Millicandela Rating=120mcd, Supplier Device Package=0402, Supplier Part Number 1=BL-HKC37A-AV-TRBCT-ND, Voltage - Forward (Vf) (Typ)=2.2V, Color=Yellow, componentlink1description=Datasheet, componentlink1url=https://americanbrightled.com/pdffiles/smt/BL-HKC37A-AV-TRB.pdf, ComponentLink2Description="DigiKey Link", ComponentLink2URL=https://www.digikey.com/en/products/detail/american-bright-optoelectronics-corporation/BL-HKC37A-AV-TRB/9678171, Configuration=Standard, Height (Max)=0.45mm, lastupdated="11/9/2022 10:29:51 am", Lens Style="Rectangle with Flat Top", Lens Transparency=Clear, Lifecycle Status=Active, Minimum Order=1, Mounting Type="Surface Mount", Package / Case="0402 (1005 Metric)", packaging=TapeAndReel, Part Number=BL-HKC37A-AV-TRB, Part Status=Active, partid=1041, price=0.06, series=-, Size / Dimension="1.00mm L x 0.50mm W", Supplier 1=DigiKey, Viewing Angle=120°, Wavelength - Dominant=589nm, Wavelength - Peak=590nm
D4: library part CMP-00278-106758013-1, "NRVUS1GFA Rectifier Diode, 1 Phase, 1 Element, 1A, 400V V(RRM), Silicon", Manufacturer Lifecycle Status="ACTIVE, NOT REC", Lifecycle Status=NRND, NexarPartId=106758013
J1: "USB Connectors 24 Receptacle 1 8.94*7.3mm RoHS", Package=Package, Check_prices=https://www.snapeda.com/parts/TYPE-C-31-M-12/HRO+Electronics+Co.%252C+Ltd./view-part/?ref=eda, MF="HRO Electronics Co., Ltd.", MP=TYPE-C-31-M-12, SnapEDA_Link=https://www.snapeda.com/parts/TYPE-C-31-M-12/HRO+Electronics+Co.%252C+Ltd./view-part/?ref=snap
J2: library part SSW-104-03-T-S, "CONN RCPT 4POS 0.1 TIN PCB", Current Rating (Amps)="5.7A per Contact", Insulation Color=Black, Manufacturer="Samtec Inc.", Material Flammability Rating="UL94 V-0", Operating Temperature="-55°C ~ 105°C", Supplier Part Number 1=SSW-104-03-T-S-ND, ComponentLink2Description="DigiKey Link", ComponentLink2URL=http://digikey.com/product-detail/en/samtec-inc/SSW-104-03-T-S/SSW-104-03-T-S-ND/7874034, Connector Type=Receptacle, Contact Finish - Mating=Tin, Contact Finish - Post=Tin, Contact Type=Forked, Fastening Type=Push-Pull, lastupdated="6/21/2022 3:08:52 PM", Lifecycle Status=Active, Minimum Order=1, Mounting Type="Through Hole", Number of Positions=4, Number of Positions Loaded=All, Number of Rows=1, packaging=Bulk, Part Number=SSW-104-03-T-S, Part Status=Active, price=0.83, series=SSW, Style="Board to Board or Cable", Supplier 1=DigiKey, Termination=Solder
MOSFET1 MOSFET2 U12: "No Description Available", Mfr_Name="Diodes Inc", RefDes=RefDes, Type=Type
R1 R2 R3 R5 R6 R7 R10 R12 R13 R14 R15 R16 R17 R28: library part CMP-009-00019-5, "Chip Resistor, 12 KOhm, +/- 1%, 63 mW, -55 to 155 degC, 0402 (1005 Metric)", Case/Package=0402, Max Operating Temperature=155°C, Min Operating Temperature=-55°C, Power=63mW, Tolerance=1%, Voltage Rating=50V, Mounting Technology=SM, Pins=2, RoHS Compliant=True
R4: library part CMP-2001-04896-1, Manufacturer="Vishay Dale", Part Number=CRCW08050000Z0EA
R8 R9 R29: library part CMP-2005-03839-2, Manufacturer=Panasonic, Part Number=ERJ-L14KF20MU
R11: library part CMP-009-00019-5, "Chip Resistor, 1.5 KOhm, +/- 1%, 63 mW, -55 to 155 degC, 0402 (1005 Metric)", Case/Package=0402, Max Operating Temperature=155°C, Min Operating Temperature=-55°C, Power=63mW, Tolerance=1%, Voltage Rating=50V, Mounting Technology=SM, Pins=2, RoHS Compliant=True
R18 R19 R20 R21 R22 R23 R24: library part CMP-1015-00110-3, "RES SMD 205K OHM 1% 1/2W 2008", Case Code (Imperial)=1210, Case Code (Metric)=3225, Max Operating Temperature=155°C, Min Operating Temperature=-55°C, Package Quantity=5000, Power Rating=500mW, Resistance=33kR, Temperature Coefficient=200ppm/°C, Tolerance=5%, Voltage Rating=200V, Case/Package=1210, Composition="Thick Film", Contact Plating=Tin, Height=0.55mm, Lead Free="Lead Free", Length=3.2mm, Mount="Surface Mount", packaging="Tape and Reel", Radiation Hardening=No, Termination=SMD/SMT, Voltage Rating (DC)=200V, Weight=0.000564oz, Width=2.5mm
R25 R26 R27: library part CMP-009-00019-5, "Chip Resistor, 10 KOhm, +/- 1%, 63 mW, -55 to 155 degC, 0402 (1005 Metric)", Case/Package=0402, Max Operating Temperature=155°C, Min Operating Temperature=-55°C, Power=63mW, Tolerance=1%, Voltage Rating=50V, Mounting Technology=SM, Pins=2, RoHS Compliant=True
U1 U2: library part CMP-10112-000033-1, "IC I/O EXPANDER I2C 40B 56TSSOP", Case/Package=TSSOP, Frequency=1MHz, Max Operating Temperature=85°C, Max Power Dissipation=500mW, Max Supply Voltage=5.5V, Min Operating Temperature=-40°C, Min Supply Voltage=2.3V, Nominal Supply Current=100mA, Output Current=50mA, Package Quantity=35, Interface=I2C, Lead Free="Lead Free", Max Frequency=1MHz, Mount="Surface Mount", Number of I/Os=40, Number of Pins=56, packaging=Rail/Tube, Radiation Hardening=No, series=-, Supply Current=100mA, Supply Voltage-Nom=5.5V, Weight=0.026103oz
U3 U4 U5 U6 U7 U8 U9 U10 U11: "No Description Available", Mfr_Name="Texas Instruments", RefDes=RefDes, Type=TYPE
U13: library part CMP-09139-000444-1, "IC REG CTRLR MULT TOPOLOGY 10DFN", Case/Package=DFN, Max Input Voltage=40V, Max Operating Temperature=125°C, Max Output Current=12uA, Max Output Voltage=350V, Min Input Voltage=2.9V, Min Operating Temperature=-40°C, Min Output Voltage=1.569V, Output Current=25A, Package Quantity=121, Switching Frequency=1MHz, Clock Sync=Yes, Height=0.7mm, Length=3mm, Max Supply Voltage=40V, Min Supply Voltage=2.9V, Mount="Surface Mount", Number of Output Phases=1, Number Of Outputs=1, Number of Pins=10, Output Voltage=350V, packaging=Rail/Tube, REACH SVHC="No SVHC", RoHS Compliant=Yes, Synchronous Rectifier=No, Topology=Boost, Width=3mm
U14: "No Description Available", Mfr_Name=Coilcraft, RefDes=RefDes, Type=Type
U17: library part CMP-04918-000081-1, "DC/DC CONVRTR 36VIN 1V-12VOUT  3", Ambient Temperature Range High=+105°C, Ambient Temperature Range Low=-40°C, Manufacturer="Texas Instruments", Max Junction Temp=+150°C, Max Supply Voltage=36V, Min Supply Voltage=3.8V, Nominal Supply Current=24uA, Output Current=4A, Output Voltage=1-7V, Package=RDA0015A, Switching Frequency=1.4MHz, Temperature="-40°C to +125°C", Temperature Range High=+125°C, Automotive=No, Category=IC, ComponentLink2Description=Datasheet, ComponentLink2URL=http://www.ti.com/lit/ds/symlink/tpsm53604.pdf, Device Class L1="Integrated Circuits (ICs)", Device Class L2="Power Management ICs", Device Class L3="Voltage Regulators - Switching", Digikey Description="DC/DC CONVRTR 36VIN 1V-12VOUT  3", Height=4.1mm, Lead Free=Yes, Manufacturer Part Number=TPSM53604RDAR, Max Duty Cycle=98%, Number Of Outputs=1, Octopart=https://octopart.com/tpsm53604rdar-texas+instruments-106673079, Output Type=AdjustableProgrammable, RoHS=TRUE, Switching Topology=Buck-Boost, Temperature Range Low=-40°C
U18 U19 U20 U21 U22 U23: "No Description Available", Mfr_Name=Worldsemi, RefDes=RefDes, Type=Type

## Free pads (board coordinates)
  round 196.85 hole 118.11: 3(1060,920) 3(7075,920) 3(7075,2665)

## Via types
v1: diameter 17.72, hole 7.87, Top Layer to Bottom Layer, tented both sides, 331 vias
v2: diameter 19.68, hole 7.87, Top Layer to Bottom Layer, tented both sides, 75 vias
v3: diameter 19.68, hole 7.87, Top Layer to Bottom Layer, 11 vias

## Nets (pads, with @x,y where several pads share a name; then routed paths per layer and width w, separated by ;. In a path a pad name is that pad's centre, name@x,y a point inside that pad or via, vN(x,y) a via of type N, cw(c..) or ccw(c..) an arc to the next point about the centre after c; other vN are vias at no path point)
3V3: *.4 C17.2 C18.2 C19.2 C21.1 C22.1 C23.1 C24.1 J2.3 R25.2 R26.2 U1.18 U1.46 U1.56 U2.18 U2.27 U2.46 U2.56 U17.7 U17.8 | length 996.5
  Top Layer w5: v1(2683.07,2058.07) 2683.4,2058.07 2719.39,2022.08 2719.39,2021.76 U1.46@2725.46,2021.76
  Top Layer w6: v1(2755.17,2216.78) 2803.04,2216.78 2834.89,2184.94 U1.56@2839.72,2184.94 ; U2.56@5536.05,2369.27 5540.89,2369.27 5573.68,2402.05 5591.03,2402.05 v1(5591.54,2402.56) ; v1(5547.24,1955.71) 5614.17,1888.78 5614.17,1799.55 5594.51,1779.89 5594.51,1778.72 U2.27@5589.1,1778.72
  Top Layer w10: C24.1@2328.42,2135.09 2346.78,2116.73 2358.59,2116.73 C23.1@2359.92,2115.41 ; v1(2348.43,2092.52) 2348.43,2096.05 2359.92,2107.54 C23.1@2359.92,2115.41 ; U1.18@2384.68,2092.16 2383.17,2092.16 C23.1@2359.92,2115.41 ; *.4@3660.32,2220.28 3669.96,2210.63 v1(3716.54,2210.63) v1(3716.54,2235.24) ; U2.18@5509.2,1938.73 5509.74,1938.73 5520.2,1949.19 5540.72,1949.19 v1(5547.24,1955.71) ; U2.46@5672.26,2220.74 5675.93,2224.41 5678.22,2224.41 C21.1@5699.14,2245.33 ; v1(5720.06,2224.41) 5720.06,2224.53 5699.26,2245.33 C21.1@5699.14,2245.33 ; v1(5761.81,2282.48) 5760.33,2281 5754.9,2281 5740.14,2266.25 C22.1@5732.92,2266.25 5713.33,2246.66 5700.46,2246.66 C21.1@5699.14,2245.33
  Bottom Layer w20: v1(5761.81,2282.48) 5796.26,2282.48 5848.62,2334.84 J2.3@5917.32,2334.84
  other v1: 2751.97,2240.16 5109.25,2429.13 5108.27,2464.57 5107.28,2497.05 4708.66,2512.8 5107.28,2527.56 4685.04,2532.48 4773.62,2543.31 4707.68,2544.29 4742.13,2544.29 5027.56,2546.26 5059.06,2547.24 5106.3,2559.06 4684.06,2563.98 4753.94,2566.93 4722.44,2567.91 5047.24,2569.88 5078.74,2570.87
170V: C9.1 C20.1 CR1.5 CR1.6 CR1.7 CR1.8 R4.2 R18.2 R19.2 R20.2 R21.2 R22.2 R23.2 R24.2 | length 1366.2
  Top Layer w20: v1(1509.84,1899.61) R4.2@1551.18,1899.61 ; v1(1682.09,1881.89) 1685.04,1878.94 R22.2@1685.04,1801.21 ; R23.2@2316.13,1751.55 2331.13,1751.55 v1(2354.33,1728.35) ; v1(3740.16,1812.01) R24.2@3740.16,1813.02 ; R21.2@4354.33,1813.02 v1(4356.27,1813.02) ; R19.2@5763.21,1761.45 5763.21,1758.82 v1(5782.29,1739.74)
  Top Layer w25: v1(4051.18,1686.02) 4236.38,1686.02 4298.39,1624.02 4339.15,1624.02 4417.91,1545.25 4417.91,1447.44 4322.83,1352.36 4322.83,1177.17 4237.2,1091.54 4140.8,1091.54 4080.73,1151.6 R18.2@4053.15,1151.6
  other v1: 6448.82,1809.06
  other v2: 971.09,1881.46 1001.11,1881.86 1033.59,1881.86 971.09,1912.96 1001.11,1913.35 1033.59,1913.35 971.09,1943.47 1001.11,1943.86 1033.59,1943.86 971.09,1973.98 1001.11,1974.38 1033.59,1974.38 970.47,2002.95 1000.49,2003.35 1032.97,2003.35
CC1: J1.A5 R16.1 U12.17 U15.1 | length 981.1
  Top Layer w6: J1.A5@3070.44,2478.07 v1(3070.44,2524.05) 3070.44,2547.8 3127.95,2605.32 3335.63,2605.32 U15.1@3341.54,2611.22
  Top Layer w8: U12.17@3398.35,2168.51 3422.44,2168.51 v1(3435.04,2181.1) 3436.86,2182.92 3453.97,2182.92 R16.1@3474.08,2203.03
  Mid Layer 2 w6: v1(3070.44,2524.05) 3070.44,2510.27 3308.93,2271.78 3308.93,2256.06 3318.93,2246.06 3370.08,2246.06 v1(3435.04,2181.1)
CC2: J1.B5 R17.1 U12.16 U16.1 | length 1054.5
  Top Layer w6: U16.1@2719.69,2603.35 2721.66,2601.38 2899.61,2601.38 2952.32,2548.67 v1(2952.32,2524.17) J1.B5@2952.32,2478.07
  Top Layer w8: U12.16@3398.35,2148.82 3435.24,2148.82 v1(3437.99,2151.57) 3467.62,2151.57 R17.1@3474.08,2158.03
  Mid Layer 2 w6: v1(2952.32,2524.17) 3042,2524.17 3271.78,2294.38 3271.78,2292.96 3298.93,2265.81 3298.93,2251.67 3314.66,2235.94 3352.65,2235.94 3437.01,2151.57 v1(3437.99,2151.57)
COM: D2.1 R18.1 U3.9 U4.9 U5.9 U6.9 U7.9 U8.9 U9.9 U10.9 U11.9 | length 7307.2
  Top Layer w25: v1(1233.73,1472.9) 1233.73,1478.29 U3.9@1263.08,1507.64 ; v1(1802,1633.69) 1805,1636.69 U4.9@1805,1740.43 ; v1(2569.22,1652.07) 2569.22,1666.6 U5.9@2615.11,1712.49 ; v1(3232.28,1481.3) 3241.02,1490.03 U6.9@3241.02,1507.61 ; U7.9@3870,1597.72 3870.69,1597.03 3870.69,1561.59 v1(3877.42,1554.86) ; v1(4514.76,1622.05) 4514.76,1642.15 U8.9@4580.11,1707.49 ; v1(5192.09,1489.17) 5213.18,1510.27 U9.9@5213.18,1511.74 ; v1(5970,1628.46) U10.9@5970,1737.72 ; v1(6587.6,1629.92) 6587.6,1699.98 U11.9@6600.11,1712.49
  Top Layer w29.53: v1(3877.42,1554.86) 3877.42,1548.68 3784.45,1455.71 3784.45,1172.24 3869.06,1087.63 3967.43,1087.63 4025.56,1029.5 v1(4053.15,1029.5)
  Top Layer w50: D2.1@3966.69,895.05 3984.19,912.55 3984.19,988.13 R18.1@4025.56,1029.5
  Bottom Layer w25: v1(1233.73,1472.9) 1394.52,1633.69 v1(1802,1633.69) 1802.17,1633.86 2551.01,1633.86 v1(2569.22,1652.07) ; v1@2567.91,1643.7 2579.72,1631.89 2774.61,1631.89 2925.2,1481.3 v1(3232.28,1481.3) 3253.94,1481.3 3394.68,1622.05 3871.06,1622.05 ; v1(3877.42,1554.86) 3871.06,1561.22 3871.06,1622.05 ; v1(6587.6,1629.92) 6586.14,1628.46 5507.6,1628.46 5368.31,1489.17 v1(5192.09,1489.17) 5190.94,1489.17 5180.12,1478.35 4928.15,1478.35 4784.45,1622.05 v1(4514.76,1622.05) 4053.15,1622.05 3871.06,1622.05
  Bottom Layer w29.53: 4053.15,1615.79 4054.06,1616.7
DP_0_0: NT4.12 U3.16 | length 444.2
  Top Layer w20: NT4.12@1414.69,1422.04 1415.91,1423.26 1543.26,1423.26 1582.68,1462.68 1582.68,1577.32 1559.39,1600.61 1559.39,1698.8 U3.16@1549.79,1708.39
DP_0_1: NT4.3 U4.10 | length 335.7
  Top Layer w20: U4.10@1855,1740.43 1855,1650 1881.89,1623.11 1881.89,1447.25 1867.39,1432.75 NT4.3@1867.39,1421.92
DP_0_2: NT4.4 U4.11 | length 460.5
  Top Layer w20: U4.11@1905,1740.43 1905,1665 1932.27,1637.73 1932.27,1327.94 1914,1309.67 NT4.4@1914,1298.84
DP_0_3: NT4.5 U4.12 | length 630.6
  Top Layer w20: NT4.5@1898.09,1168.2 1908.91,1168.2 1922.82,1182.1 1929.04,1182.1 1985,1238.06 1985,1655 1955,1685 U4.12@1955,1740.43
DP_0_4: NT4.6 U3.13 | length 1877.5
  Top Layer w20: U3.13@1426.92,1622.36 1426.92,1625.49 1415.64,1636.76 1412.52,1636.76 1369.27,1680 1249.88,1680 1105,1535.12 1105,1055 1310,850 1745,850 1850.39,955.39 1850.39,1028.19 1823.29,1055.3 NT4.6@1823.29,1059.91
DP_0_5: NT4.7 U3.12 | length 1459.4
  Top Layer w20: U3.12@1385.96,1593.68 1385.96,1596.81 1374.69,1608.08 1371.56,1608.08 1334.64,1645 1265,1645 1145,1525 1145,1095 1335,905 1675,905 1706.73,936.73 NT4.7@1706.73,998.78
DP_0_6: NT4.8 U3.11 | length 1086.9
  Top Layer w20: U3.11@1345,1565 1345,1569.11 1304.11,1610 1285,1610 1185,1510 1185,1130 1350,965 1561.67,965 1567.47,970.79 1567.47,991.16 NT4.8@1575.12,998.81
DP_0_7: NT4.9 U3.10 | length 665.6
  Top Layer w20: U3.10@1304.04,1536.32 1312.95,1527.42 1312.95,1486.65 1240,1413.71 1240,1175 1360,1055 1453.59,1055 NT4.9@1458.6,1060
DP_0_8: NT4.10 U3.14 | length 619.2
  Top Layer w20: NT4.10@1383.85,1168.33 1378.54,1173.64 1351.36,1173.64 1290,1235 1290,1414.59 1331.07,1455.66 1331.07,1456.68 1380.05,1505.66 1381.07,1505.66 1476.78,1601.37 1476.78,1642.13 U3.14@1467.87,1651.04
DP_0_9: NT4.11 U3.15 | length 451.9
  Top Layer w20: NT4.11@1368,1298.99 1362.88,1304.12 1362.88,1443.5 1393.23,1473.85 1394.25,1473.85 1518.43,1598.03 1518.43,1664.34 1508.83,1673.93 U3.15@1508.83,1679.72
DP_0_L: NT4.2
DP_0_R: NT4.13
DP_1_0: NT5.12 U4.15 | length 393.3
  Top Layer w20: U4.15@2105,1740.43 2105.69,1739.74 2105.69,1709.31 2145,1670 2145,1550 2254.08,1440.92 2275.3,1440.92 NT5.12@2282.96,1433.26
DP_1_1: NT5.3 U5.10 | length 407.5
  Top Layer w20: U5.10@2656.07,1683.82 2645.78,1673.53 2645.78,1666.86 2645,1666.07 2645,1630 2580,1565 2580,1485 2631.85,1433.15 NT5.3@2735.65,1433.15
DP_1_2: NT5.4 U5.11 | length 399.9
  Top Layer w20: U5.11@2697.03,1655.14 2687.43,1645.54 2687.43,1565.52 2796.26,1456.69 2796.26,1334.88 2782.27,1320.89 NT5.4@2782.27,1310.07
DP_1_3: NT5.5 U5.15 | length 400.1
  Top Layer w20: NT5.5@2766.36,1179.42 2845,1258.06 2845,1519.47 2860.86,1535.33 U5.15@2860.86,1540.42
DP_1_4: NT5.6 U5.16 | length 594.8
  Top Layer w20: NT5.6@2691.56,1071.13 2806.13,1071.13 2887.8,1152.8 2887.8,1492.63 2901.82,1506.65 U5.16@2901.82,1511.74
DP_1_5: NT5.7 U5.14 | length 1089.9
  Top Layer w20: NT5.7@2575,1010 2582.65,1002.35 2582.65,972.35 2615,940 2755,940 2960,1145 2960,1545 2910,1595 2845.8,1595 2834.3,1583.5 2831.17,1583.5 2819.9,1572.23 U5.14@2819.9,1569.1
DP_1_6: NT5.8 U5.13 | length 1469.3
  Top Layer w20: NT5.8@2443.39,1010.03 2443.39,961.61 2510,895 2800,895 3010,1105 3010,1555 2920,1645 2826.16,1645 2793.34,1612.18 2790.21,1612.18 2778.94,1600.91 U5.13@2778.94,1597.78
DP_1_7: NT5.9 U5.12 | length 1863.8
  Top Layer w20: NT5.9@2326.86,1071.22 2326.86,973.14 2445,855 2845,855 3060,1070 3060,1560 2930,1690 2797.42,1690 2737.99,1630.57 U5.12@2737.99,1626.46
DP_1_8: NT5.10 U4.13 | length 670.1
  Top Layer w20: U4.13@2005,1740.43 2005,1690 2040,1655 2040,1380 2223.86,1196.14 2224.7,1196.14 2241.29,1179.55 NT5.10@2252.12,1179.55
DP_1_9: NT5.11 U4.14 | length 505.3
  Top Layer w20: U4.14@2055,1740.43 2055,1695 2095,1655 2095,1451.48 NT5.11@2236.27,1310.21
DP_1_L: NT5.2
DP_1_R: NT5.13 U4.16 | length 335.4
  Top Layer w20: U4.16@2155,1740.43 2155.69,1739.74 2155.69,1709.31 2336.81,1528.19 2373.82,1528.19 NT5.13@2381.47,1520.53
DP_2_0: NT6.12 U6.16 | length 422.4
  Top Layer w20: NT6.12@3391.07,1429.92 3392.72,1428.26 3397.96,1428.26 3508.26,1428.26 3547.47,1467.47 3547.47,1683.52 3527.72,1703.27 U6.16@3527.72,1708.36
DP_2_1: NT6.3 U7.10 | length 205.9
  Top Layer w20: NT6.3@3843.76,1429.8 3845.42,1428.15 3850.65,1428.15 3920,1497.49 U7.10@3920,1597.72
DP_2_2: NT6.4 U7.11 | length 330.4
  Top Layer w20: NT6.4@3890.38,1306.72 3892.04,1305.07 3897.27,1305.07 3970,1377.79 U7.11@3970,1597.72
DP_2_3: NT6.5 U7.12 | length 488.3
  Top Layer w20: NT6.5@3874.47,1176.07 3876.12,1174.42 3881.36,1174.42 4020,1313.06 U7.12@4020,1597.72
DP_2_4: NT6.6 U6.13 | length 1793.6
  Top Layer w20: U6.13@3404.85,1622.32 3404.85,1635.15 3400.6,1639.4 3370,1670 3215,1670 3110,1565 3110,1065 3320,855 3685,855 3806.56,976.56 3806.56,1060.89 NT6.6@3799.67,1067.78
DP_2_5: NT6.7 U6.12 | length 1386.3
  Top Layer w20: U6.12@3363.89,1593.65 3363.89,1606.47 3359.64,1610.72 3340.36,1630 3230,1630 3149.61,1549.61 3149.61,1105.39 3360,895 3580,895 3683.11,998.11 NT6.7@3683.11,1006.65
DP_2_6: NT6.8 U6.11 | length 1010.1
  Top Layer w20: U6.11@3322.93,1564.97 3322.93,1568.1 3296.03,1595 3250,1595 3189.96,1534.96 3189.96,1140.04 3355,975 3517.53,975 3549.22,1006.69 NT6.8@3551.5,1006.69
DP_2_7: NT6.9 U6.10 | length 625.6
  Top Layer w20: U6.10@3281.98,1536.29 3290.88,1527.38 3290.88,1486.62 3245,1440.74 3245,1165 3343.78,1066.22 3433.32,1066.22 NT6.9@3434.97,1067.88
DP_2_8: NT6.10 U6.14 | length 586.8
  Top Layer w20: NT6.10@3360.23,1176.21 3360.23,1181.44 3285,1256.67 3285,1425 3312.57,1452.57 3312.57,1463.32 3384.23,1534.98 3388.36,1534.98 3460.01,1606.64 3460.01,1631.71 3445.81,1645.91 U6.14@3445.81,1651
DP_2_9: NT6.11 U6.15 | length 448.2
  Top Layer w20: NT6.11@3344.38,1306.86 3344.38,1445.46 3506.51,1607.59 3506.51,1651.82 3497.05,1661.28 3497.05,1669.39 U6.15@3486.76,1679.68
DP_2_L: NT6.2
DP_2_R: NT6.13
DP_3_0: NT3.12 U7.15 | length 216.3
  Top Layer w20: U7.15@4170,1597.72 4170,1500 4222.42,1447.58 4227.81,1447.58 4233.89,1441.51 4253.49,1441.51 NT3.12@4261.14,1433.85
DP_3_1: NT3.3 U8.10 | length 404.7
  Top Layer w20: U8.10@4621.07,1678.82 4621.07,1674.71 4555,1608.64 4555,1480 4601.85,1433.15 4713.25,1433.15 NT3.3@4713.84,1433.74
DP_3_2: NT3.4 U8.11 | length 399.5
  Top Layer w20: U8.11@4662.03,1650.14 4652.43,1640.54 4652.43,1572.57 4774.12,1450.88 4774.12,1335.13 4760.46,1321.48 NT3.4@4760.46,1310.66
DP_3_3: NT3.5 U8.15 | length 404.1
  Top Layer w20: NT3.5@4744.55,1180.01 4744.55,1187.61 4830,1273.06 4830,1455 4811.84,1473.16 4811.84,1516.31 4825.86,1530.33 U8.15@4825.86,1535.42
DP_3_4: NT3.6 U8.16 | length 612.7
  Top Layer w20: NT3.6@4669.74,1071.72 4670.34,1071.13 4801.13,1071.13 4880,1150 4880,1469.28 4857.91,1491.36 4857.91,1497.84 U8.16@4866.82,1506.74
DP_3_5: NT3.7 U8.14 | length 1074.1
  Top Layer w20: NT3.7@4553.19,1010.59 4553.19,1001.81 4610,945 4755,945 4930,1120 4930,1530 4870,1590 4810.8,1590 4799.3,1578.5 4796.17,1578.5 4784.9,1567.23 U8.14@4784.9,1564.1
DP_3_6: NT3.8 U8.13 | length 1465.5
  Top Layer w20: NT3.8@4421.58,1010.62 4417.4,1006.45 4417.4,950.62 4413.39,946.61 4455,905 4785,905 4975,1095 4975,1550 4890,1635 4786.16,1635 4758.34,1607.18 4755.21,1607.18 4743.94,1595.91 U8.13@4743.94,1592.78
DP_3_7: NT3.9 U8.12 | length 1828.9
  Top Layer w20: NT3.9@4305.05,1071.81 4297.4,1064.16 4297.4,1022.35 4296.86,1021.81 4296.86,988.14 4425,860 4810,860 5025,1075 5025,1555 4910,1670 4748.4,1670 4702.99,1624.59 U8.12@4702.99,1621.46
DP_3_8: NT3.10 U7.13 | length 498.9
  Top Layer w20: U7.13@4070,1597.72 4070,1315 4191.36,1193.64 4197.2,1193.64 4203.05,1187.8 4222.65,1187.8 NT3.10@4230.31,1180.14
DP_3_9: NT3.11 U7.14 | length 340.8
  Top Layer w20: U7.14@4120,1597.72 4120,1380 4175.61,1324.39 4181.26,1324.39 4187.2,1318.45 4206.81,1318.45 NT3.11@4214.46,1310.8
DP_3_L: NT3.2
DP_3_R: NT3.13 U7.16 | length 181.7
  Top Layer w20: U7.16@4220,1597.72 4220,1580.98 4280.45,1520.53 4359.07,1520.53 NT3.13@4359.66,1521.12
DP_4_0: NT1.12 U9.16 | length 419.3
  Top Layer w20: NT1.12@5362.96,1418.26 5458.26,1418.26 5515,1475 5515,1692.29 5499.89,1707.41 U9.16@5499.89,1712.49
DP_4_1: NT1.3 U10.10 | length 404.2
  Top Layer w20: NT1.3@5815.65,1418.15 6020,1622.49 U10.10@6020,1737.72
DP_4_2: NT1.4 U10.11 | length 528.7
  Top Layer w20: NT1.4@5862.27,1295.07 5863.59,1296.39 5863.59,1373.59 6070,1580 U10.11@6070,1737.72
DP_4_3: NT1.5 U10.12 | length 686.6
  Top Layer w20: NT1.5@5846.36,1164.42 5935,1253.06 5935,1375 6120,1560 U10.12@6120,1737.72
DP_4_4: NT1.6 U9.13 | length 1763
  Top Layer w20: U9.13@5377.01,1626.46 5377.01,1629.59 5365.74,1640.86 5362.61,1640.86 5333.47,1670 5190,1670 5075,1555 5075,1075 5290,860 5655,860 5771.56,976.56 NT1.6@5771.56,1056.13
DP_4_5: NT1.7 U9.12 | length 1405.8
  Top Layer w20: U9.12@5336.06,1597.78 5336.06,1600.91 5324.79,1612.18 5321.66,1612.18 5303.84,1630 5205,1630 5116.14,1541.14 5116.14,1098.86 5310,905 5625,905 5655,935 NT1.7@5655,995
DP_4_6: NT1.8 U9.11 | length 1036.8
  Top Layer w20: U9.11@5295.1,1569.1 5295.1,1572.23 5283.83,1583.5 5280.7,1583.5 5266.76,1597.44 5227.44,1597.44 5157.78,1527.78 5157.78,1122.22 5325,955 5478.57,955 5518.6,995.03 NT1.8@5523.39,995.03
DP_4_7: NT1.9 U9.10 | length 652.7
  Top Layer w20: U9.10@5254.14,1540.42 5263.74,1530.82 5263.74,1489.13 5209.65,1435.04 5209.65,1150.35 5303.78,1056.22 NT1.9@5406.86,1056.22
DP_4_8: NT1.10 U9.14 | length 635.5
  Top Layer w20: NT1.10@5332.12,1164.55 5267.62,1164.55 5255.91,1176.27 5255.91,1436.31 5398.72,1579.13 5400.54,1579.13 5426.88,1605.47 5426.88,1646.23 U9.14@5417.97,1655.14
DP_4_9: NT1.11 U9.15 | length 465
  Top Layer w20: NT1.11@5316.27,1295.21 5308.62,1302.86 5308.62,1323.3 5305,1326.92 5305,1435 5468.53,1598.53 5468.53,1674.22 U9.15@5458.93,1683.82
DP_4_L: NT1.2
DP_4_R: NT1.13
DP_5_0: NT2.12 U10.15 | length 335.9
  Top Layer w20: NT2.12@6261.14,1414.17 6253.49,1421.82 6253.49,1441.16 6250.61,1444.04 6251.55,1444.98 6251.55,1536.55 6270,1555 U10.15@6270,1737.72
DP_5_1: NT2.3 U11.10 | length 307.9
  Top Layer w20: U11.10@6641.07,1683.82 6631.47,1674.22 6631.47,1568.53 6706.19,1493.81 6706.19,1421.7 NT2.3@6713.84,1414.05